# Altium PCB ESP32_HID.PcbDoc (part 1 of 2)
Units mm, origin at the board's own origin, x right, y up, seen from the top; angles counter-clockwise.
Board outline 200 x 178.5 mm, 4 copper layers (Top Layer, Layer 1, Layer 2, Bottom Layer), stack 1.781 mm thick; 132 components, 105 nets, 776 pads, 137 vias.
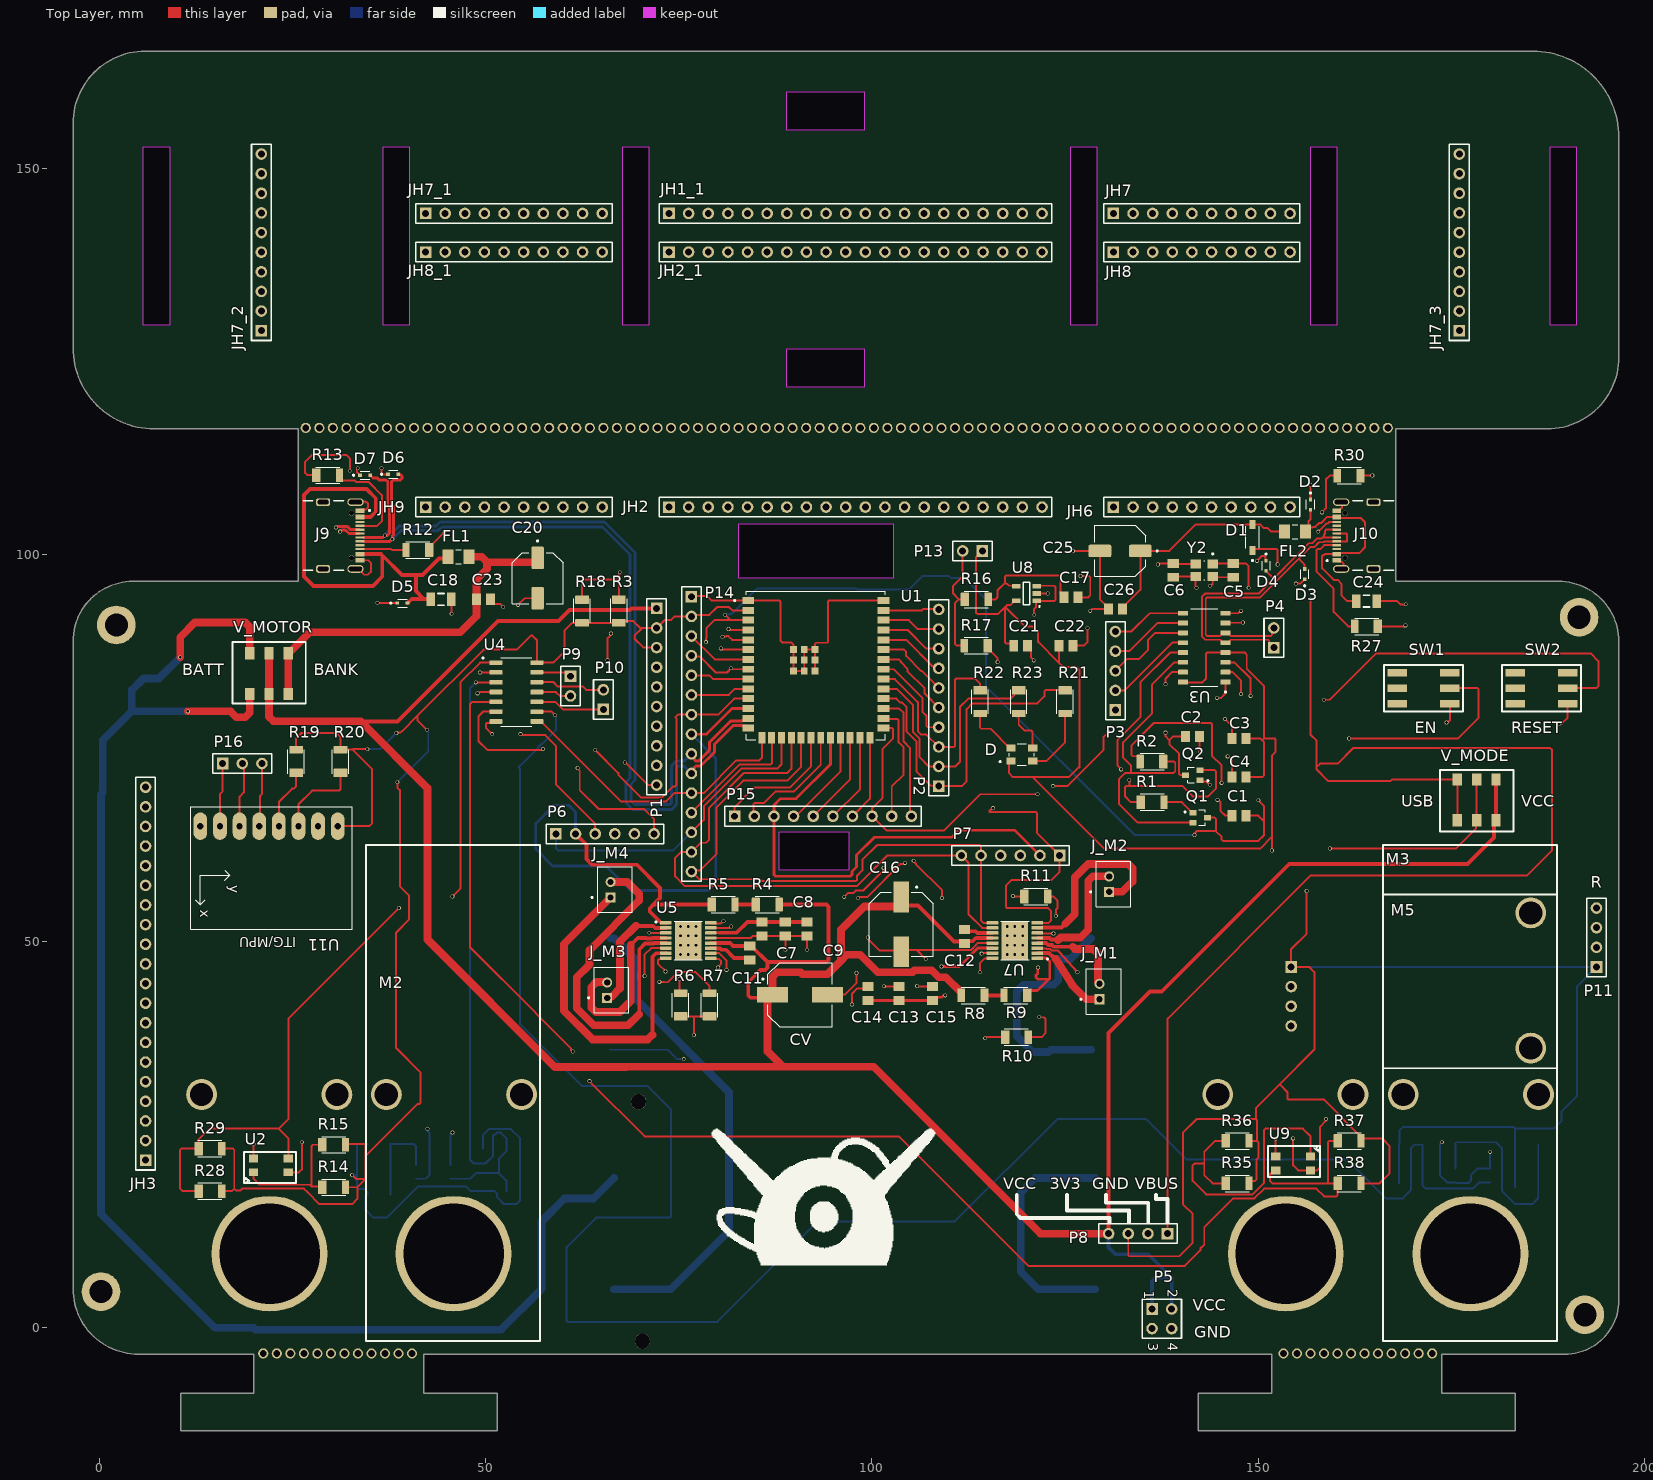
[diagram p0: Top Layer view]
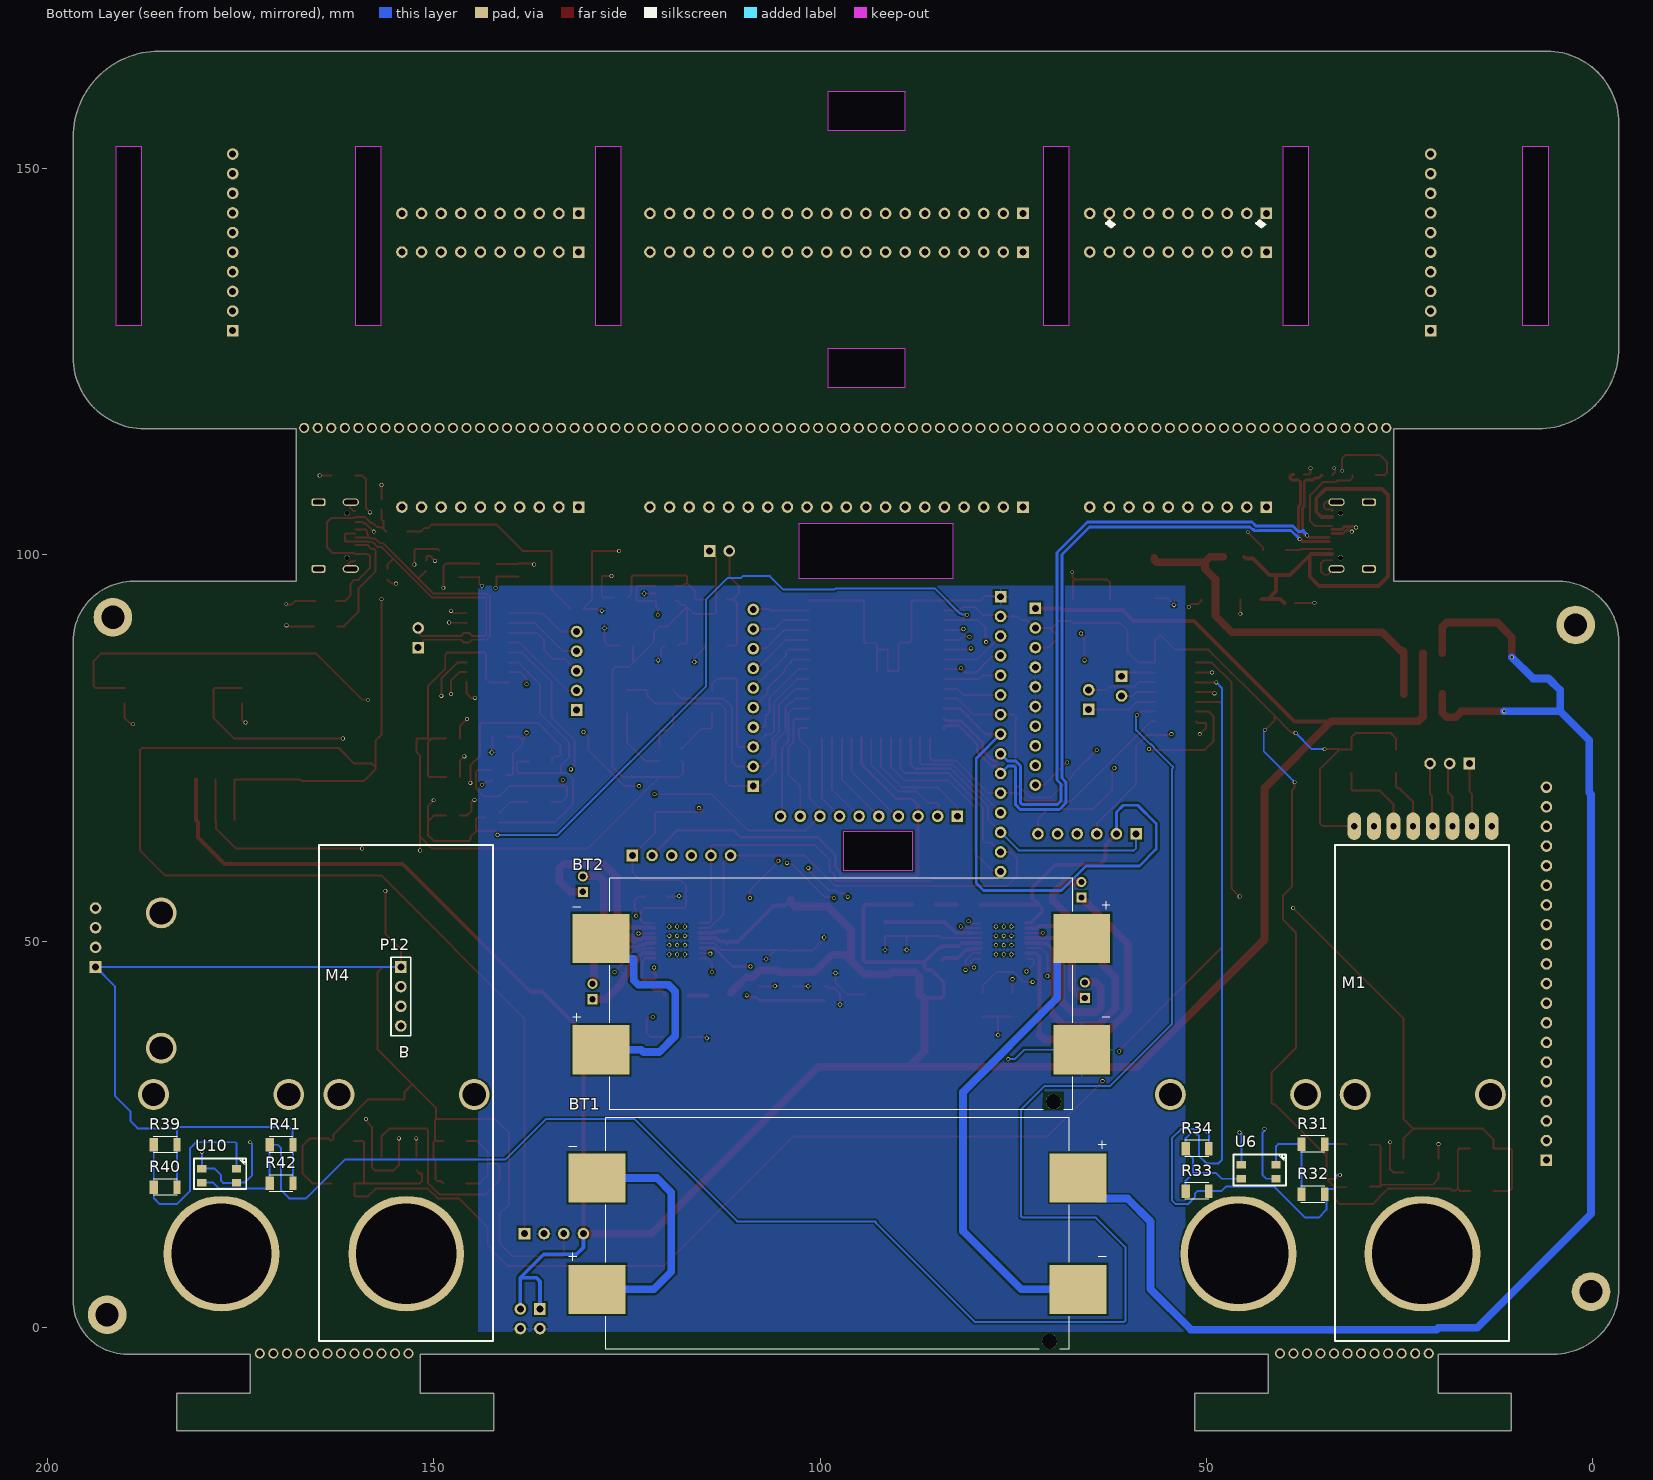
[diagram p1: Bottom Layer view, seen from below]
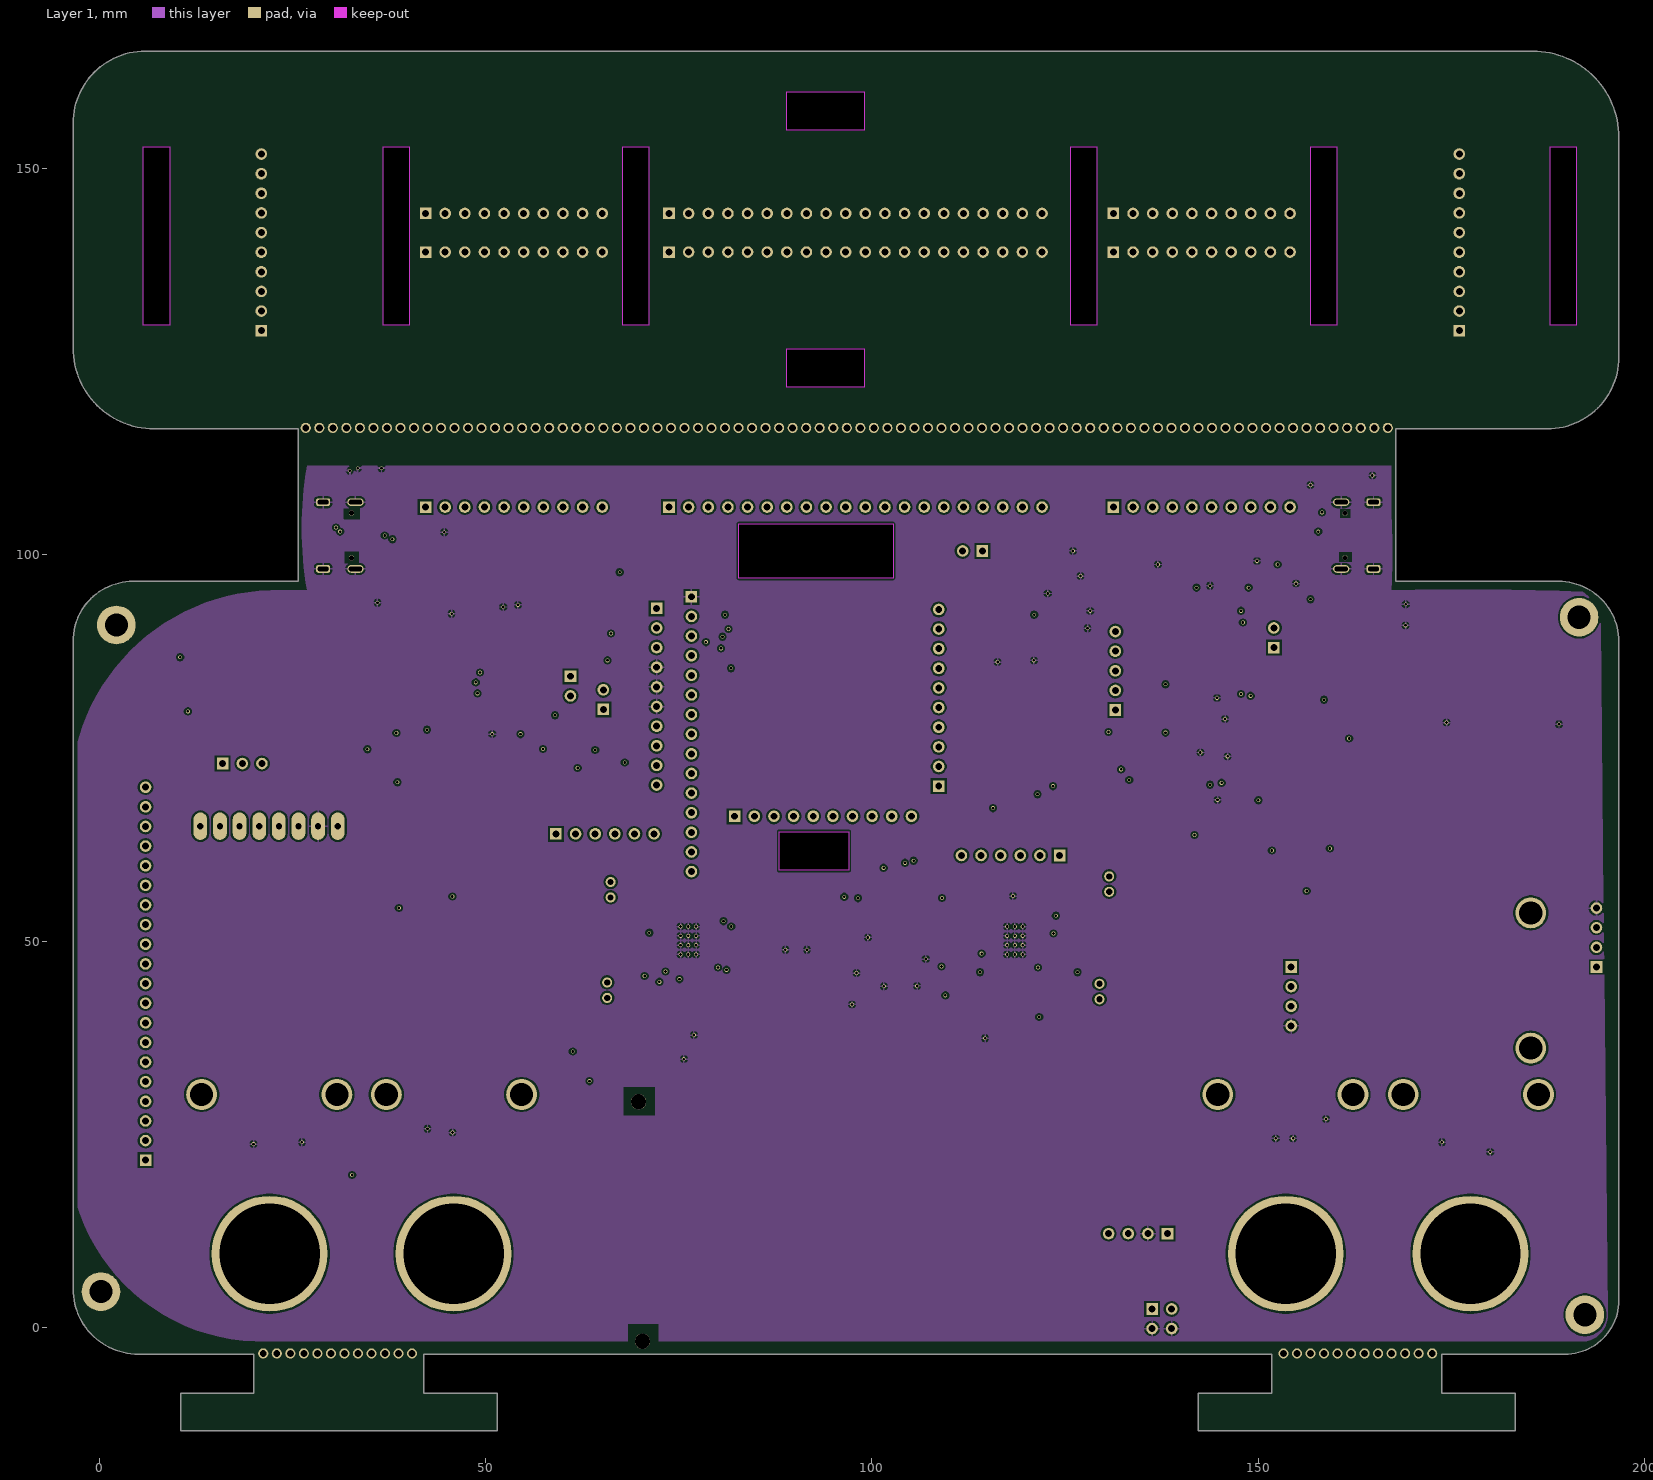
[diagram p2: Layer 1]
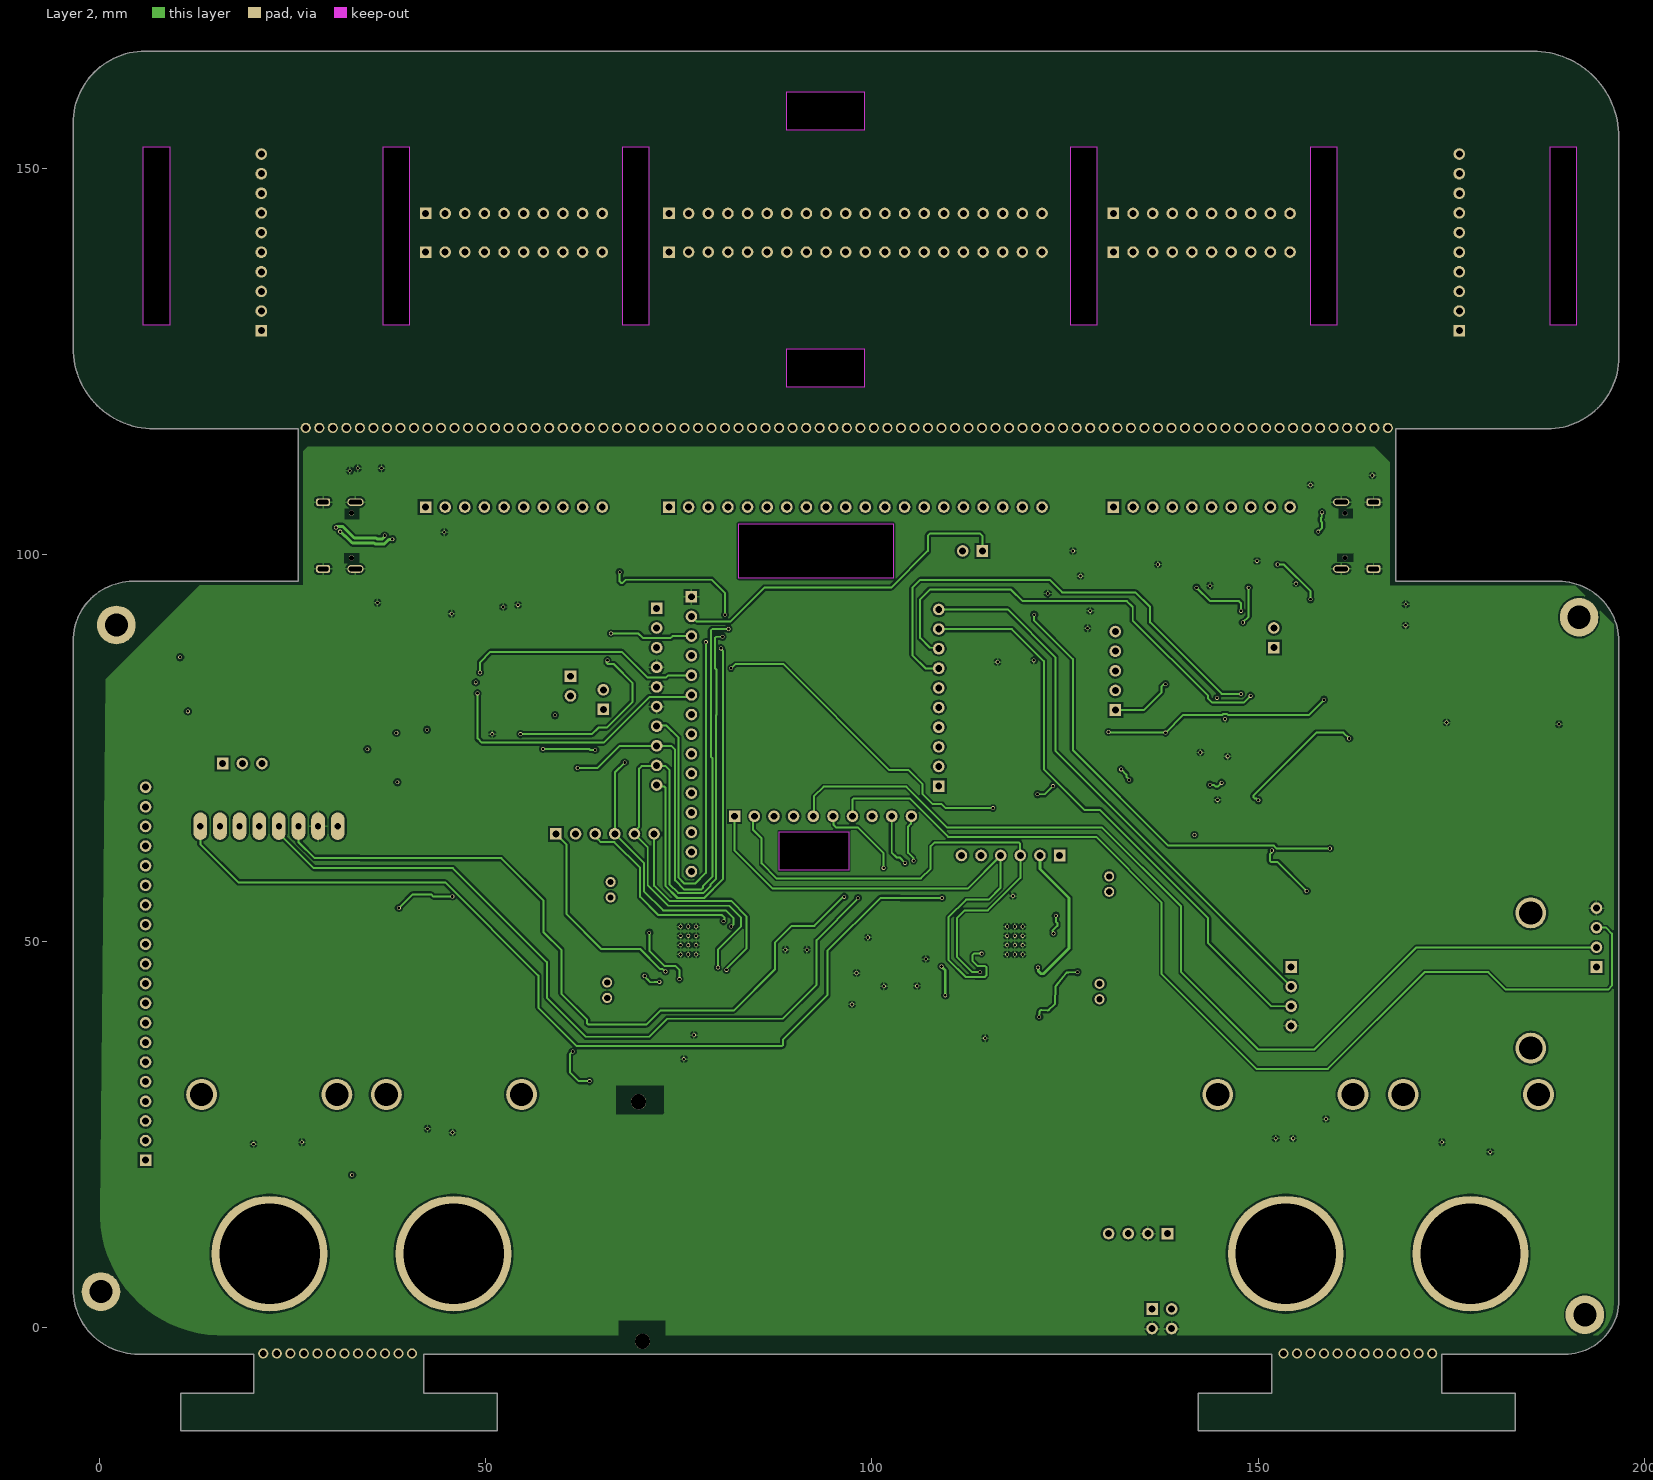
[diagram p3: Layer 2]

## Layer stack, top to bottom
Top Solder: solder mask 0.0254, SM-001, Dk 4
Top Layer: signal copper 0.035
Dielectric 2: prepreg 0.0711, PP-006, Dk 4.1
Layer 1: signal copper 0.035
Dielectric 1: core 1.4986, Core-043, Dk 4.3
Layer 2: signal copper 0.035
Dielectric 3: prepreg 0.0711, PP-006, Dk 4.1
Bottom Layer: signal copper 0.035
Bottom Solder: solder mask 0.0254, SM-001, Dk 4

## Board outline
151.75,-3.425 151.75,-8.475 142.25,-8.475 142.25,-13.325 183.25,-13.325 183.25,-8.475 173.75,-8.475 173.75,-3.425 189.65,-3.425 ccw(c189.663,3.562) 196.65,3.575 196.65,88.775 ccw(c188.85,88.775) 188.85,96.575 167.75,96.575 167.75,116.3 187.375,116.3 ccw(c187.375,125.575) 196.65,125.575 196.65,154.025 ccw(c185.5,154.025) 185.5,165.175 6,165.175 ccw(c6,155.825) -3.35,155.825 -3.35,126.775 ccw(c7.125,126.775) 7.125,116.3 25.75,116.3 25.75,96.575 4.4,96.575 ccw(c4.4,88.825) -3.35,88.825 -3.35,5.032 ccw(c5.094,5.019) 5.1,-3.425 20,-3.425 20,-8.475 10.55,-8.475 10.55,-13.325 51.5,-13.325 51.5,-8.475 42,-8.475 42,-3.425 53.648,-3.425 cw(c53.649,-3.425) 53.65,-3.425
cut-out: 99,159.925 99,154.925 89,154.925 89,159.925
cut-out: 99,126.675 99,121.675 89,121.675 89,126.675
cut-out: 156.75,129.675 156.75,152.825 160.125,152.825 160.125,129.675
cut-out: 187.75,129.675 187.75,152.825 191.125,152.825 191.125,129.675
cut-out: 125.75,129.675 125.75,152.825 129.125,152.825 129.125,129.675
cut-out: 67.75,129.675 67.75,152.825 71.125,152.825 71.125,129.675
cut-out: 36.75,129.675 36.75,152.825 40.125,152.825 40.125,129.675
cut-out: 5.75,129.675 5.75,152.825 9.125,152.825 9.125,129.675
cut-out: 97,64.175 97,59.175 88,59.175 88,64.175
cut-out: 102.75,104 102.75,97 82.75,97 82.75,104

## Design rules (kind name [scope] priority, off if disabled: settings)
Clearance [All] p1: gap=0.254 ignorepadtopadclearanceinfootprint=FALSE except(0.1: Poly-Hole; 0.127: Arc-Arc Arc-Track Arc-SMDPad Track-Track Track-SMDPad SMDPad-SMDPad SMDPad-THPad; 0.2: Arc-THPad Track-THPad)
DiffPairsRouting [All] p1: maxlimit=0.254 minlimit=0.127 mostfreqgap=0.254 toplayer_minwidth=0.254 toplayer_maxwidth=0.381 toplayer_prefwidth=0.381 midlayer1_minwidth=0.254 midlayer1_maxwidth=0.381 midlayer1_prefwidth=0.381 midlayer2_minwidth=0.254 midlayer2_maxwidth=0.381 midlayer2_prefwidth=0.381 bottomlayer_minwidth=0.254 bottomlayer_maxwidth=0.381 bottomlayer_prefwidth=0.381 maxuncoupledlength=12.7
HoleSize [All] p1: absolutevalues=TRUE maxlimit=13 minlimit=0.025 maxpercent=80.000 minpercent=20.000
MinimumSolderMaskSliver [All] p1: minsoldermaskwidth=0.05
PolygonConnect [All] p1: connectstyle=Relief reliefconductorwidth=0.254 reliefentries=4 polygonreliefangle="90 Angle" airgapwidth=0.254
RoutingVias [All] p1: holewidth=0.2 width=0.5 viastyle="Through Hole" minholewidth=0.15 minwidth=0.2 maxholewidth=0.2 maxwidth=0.5
SilkToSilkClearance [All] p1: silktosilkclearance=0.01
SilkToSolderMaskClearance [IsPad] p1: minsilkscreentomaskgap=0.001 clearancetoexposedcopper=TRUE
SolderMaskExpansion [All] p1: expansion=0.102 istentingtop=FALSE
SupplyNets "Schematic Supply Nets_4" [InNet('GND')] p1: voltage=0.000
SupplyNets "Schematic Supply Nets_3" [InNet('VCC')] p2: voltage=0.000
SupplyNets "Schematic Supply Nets_2" [InNet('3V3')] p3: voltage=0.000
SupplyNets "Schematic Supply Nets_1" [InNet('VBUS')] p4: voltage=0.000
SupplyNets "Schematic Supply Nets" [InNet('VBAT')] p5: voltage=0.000
UnRoutedNet [All] p1: checkbadconnections=TRUE
Width "Schematic Width Constraint_6" [InNet('NetC18_2')] p1: maxlimit=0.5 minlimit=0.254 preferedwidth=0.254
Width "Schematic Width Constraint_5" [InNet('VBANK')] p2: maxlimit=1 minlimit=0.3 preferedwidth=0.5
Width "Schematic Width Constraint_4" [InNet('NetBT2_N2')] p3: maxlimit=1 minlimit=0.254 preferedwidth=0.5 midlayer1_maxwidth=0.254 midlayer1_prefwidth=0.254 midlayer2_maxwidth=0.254 midlayer2_prefwidth=0.254 minimp=50.000000 maximp=50.000000 favimp=50.000000
Width "Schematic Width Constraint_3" [InNet('VBAT')] p4: maxlimit=1 minlimit=0.254 preferedwidth=0.5 midlayer1_maxwidth=0.254 midlayer1_prefwidth=0.254 midlayer2_maxwidth=0.254 midlayer2_prefwidth=0.254 minimp=50.000000 maximp=50.000000 favimp=50.000000
Width "Schematic Width Constraint_2" [InNet('NetBT1_N1')] p5: maxlimit=1 minlimit=0.254 preferedwidth=0.5 midlayer1_maxwidth=0.254 midlayer1_prefwidth=0.254 midlayer2_maxwidth=0.254 midlayer2_prefwidth=0.254 minimp=50.000000 maximp=50.000000 favimp=50.000000
Width "Schematic Width Constraint_1" [InNet('NetBT1_N2')] p6: maxlimit=1 minlimit=0.254 preferedwidth=0.5 midlayer1_maxwidth=0.254 midlayer1_prefwidth=0.254 midlayer2_maxwidth=0.254 midlayer2_prefwidth=0.254 minimp=50.000000 maximp=50.000000 favimp=50.000000
Width "Schematic Width Constraint" [InNetClass('Vm')] p7: maxlimit=1 minlimit=0.354 preferedwidth=0.5
Width Width_1 [All] p8: maxlimit=0.254 minlimit=0.13 preferedwidth=0.254
24 further rules are at their usual default settings.

## Classes and differential pairs
component class U_Sensors: P9 P10 P11 P12 P16 R14 R15 R19 R20 R28 R29 R31 R32 R33 R34 R35 R36 R37 R38 R39 R40 R41 R42 U2 U4 U6 U9 U10 U11
net class Vm: NetC7_1 NetC11_2 NetC12_2 NetC13_1 NetJ_M1_1 NetJ_M1_2 NetJ_M2_1 NetJ_M2_2 NetJ_M3_1 NetJ_M3_2 NetJ_M4_1 NetJ_M4_2 NetR4_1 NetR8_1 NSLEEP NSLEEP_2 VCC
component class "U_DC Motor Control": C7 C8 C9 C11 CV J_M3 J_M4 M3 M4 P6 R4 R5 R6 R7 U5
component class "U_DC Motor Control_2": C12 C13 C14 C15 C16 J_M1 J_M2 M1 M2 P7 R8 R9 R10 R11 U7
component class "U_Power Regulation": BT1 BT2 C17 C18 C20 C21 C22 C23 D5 D6 D7 FL1 J9 P5 P8 P13 R12 R13 R16 R17 U8 V_MODE V_MOTOR
component class U_USB: C1 C2 C3 C4 C5 C6 C24 C25 C26 D1 D2 D3 D4 FL2 J10 P3 P4 Q1 Q2 R1 R2 R27 R30 SW1 SW2 U3 Y2
component class U_ESP32_S2_solo: D P1 P2 P14 P15 R3 R18 R21 R22 R23 U1
differential pair D1: +D1_P -D1_N
differential pair D: +D_P -D_N

## Components (designator, comment, footprint, x,y, rotation, side; value= is the part's Value field where it differs from the comment)
BT1 "1012" BAT_1012 97.75,12.175 r0 bottom
BT2 "1012" BAT_1012 97.25,43.175 r0 bottom
C1 "0.1uf" CAPC2012X140N 147.5,66.25 r0 top
C2 "0.1uf" CAPC2012X140N 141.5,76.5 r180 top
C3 "0.1uf" CAPC2012X140N 147.5,76.25 r0 top
C4 "0.1uf" CAPC2012X140N 147.5,71.25 r0 top
C5 "33pf" CAPC2012X140N 146.75,98 r270 top
C6 "33pf" CAPC2012X140N 139,98 r90 top
C7 "LD051A121KAB2A" CAPC2012X140N 88.8,51.6 r270 top
C8 "LD051A121KAB2A" CAPC2012X140N 85.8,51.6 r270 top
C9 "LD051A121KAB2A" CAPC2012X140N 91.6,51.6 r270 top
C11 "LD051A121KAB2A" CAPC2012X140N 84.2,48.5 r270 top
C12 "LD051A121KAB2A" CAPC2012X140N 112,50.6 r90 top
C13 "LD051A121KAB2A" CAPC2012X140N 103.5,43.25 r90 top
C14 "LD051A121KAB2A" CAPC2012X140N 99.5,43.25 r90 top
C15 "LD051A121KAB2A" CAPC2012X140N 107.85,43.25 r90 top
C16 "EEEHA1V101UP" CAP_EEEHA1V101UP 103.8,52.2 r270 top
C17 "0.1uf" CAPC2012X140N 125.75,94.5 r180 top
C18 "Cap Semi" C1206 44.25,94.25 r180 top value=10nF
C20 "10uf" CAPAE660X550N 56.75,97 r270 top
C21 "0.1uf" CAPC2012X140N 119.25,88.25 r180 top
C22 "0.1uf" CAPC2012X140N 125.1,88.25 r180 top
C23 "0.1uf" CAPC2012X140N 49.75,94.25 r180 top
C24 "Cap Semi" C1206 164,94 r180 top value=10nF
C25 "10uf" CAPAE660X550N 132.115,100.5 r180 top
C26 "0.1uf" CAPC2012X140N 131.5,93 r0 top
CV "EEEHA1V101UP" CAP_EEEHA1V101UP 90.7,43.1 r0 top (schematic designator C10)
D "LL-R3528RGBC-008-B" LED_LL-R3528RGBC-008-B 119.4,74.15 r0 top
D1 "1N5819HW-7-F" SOD3715X145N 149.25,102.25 r90 top
D2 "LESD5D5.0CT1G" TVS_LESD5D5.0CT1G 156.75,106.5 r270 top
D3 "LESD5D5.0CT1G" TVS_LESD5D5.0CT1G 156,97.5 r90 top
D4 "LESD5D5.0CT1G" TVS_LESD5D5.0CT1G 151,98.59 r270 top
D5 "LESD5D5.0CT1G" TVS_LESD5D5.0CT1G 39.25,93.75 r0 top
D6 "LESD5D5.0CT1G" TVS_LESD5D5.0CT1G 38.06,110.425 r0 top
D7 "LESD5D5.0CT1G" TVS_LESD5D5.0CT1G 34.425,110.3 r0 top
FL1 "BLM31PG330SN1L" BEADC3216X130N 46.5,99.75 r0 top
FL2 "BLM31PG330SN1L" BEADC3216X130N 154.75,103 r180 top
J9 "USB4105-GF-A" GCT_USB4105-GF-A 29,102.5 r270 top
J10 "USB4105-GF-A" GCT_USB4105-GF-A 164.9,102.5 r90 top
J_M1 "B2B-PH-K-S(LF)(SN)" JST_B2B-PH-K-S(LF)(SN) 130,43.5 r270 top
J_M2 "B2B-PH-K-S(LF)(SN)" JST_B2B-PH-K-S(LF)(SN) 131.25,57.4 r270 top
J_M3 "B2B-PH-K-S(LF)(SN)" JST_B2B-PH-K-S(LF)(SN) 66.3,43.675 r270 top
J_M4 "B2B-PH-K-S(LF)(SN)" JST_B2B-PH-K-S(LF)(SN) 66.75,56.675 r270 top
JH1_1 "Comment" HDR1X20 73.75,144.175 r0 top
JH2 "Comment" HDR1X20 73.75,106.175 r0 top
JH2_1 "Comment" HDR1X20 73.75,139.175 r0 top
JH3 "Comment" HDR1X20 6.025,21.675 r90 top
JH6 "Comment" HDR1X10 131.25,106.175 r0 top
JH7 "Comment" HDR1X10 131.25,144.175 r0 top
JH7_1 "Comment" HDR1X10 42.25,144.175 r0 top
JH7_2 "Comment" HDR1X10 21,129 r90 top
JH7_3 "Comment" HDR1X10 176,129 r90 top
JH8 "Comment" HDR1X10 131.25,139.175 r0 top
JH8_1 "Comment" HDR1X10 42.25,139.175 r0 top
JH9 "Comment" HDR1X10 42.25,106.175 r0 top
M1 "Motor_Mechanical" MOTOR_MECHANICAL 13.275,30.175 r0 bottom
M2 "Motor_Mechanical" MOTOR_MECHANICAL 54.675,30.175 r180 top
M3 "Motor_Mechanical" MOTOR_MECHANICAL 186.25,30.175 r180 top
M4 "Motor_Mechanical" MOTOR_MECHANICAL 144.75,30.175 r0 bottom
P1 "Header 10" HDR1X10 72.15,93.075 r270 top
P2 "Header 10" HDR1X10 108.65,70.075 r90 top
P3 "Header 5" HDR1X5 131.5,79.92 r90 top
P4 "Header 2" HDR1X2 152,88 r90 top
P5 "Header 2X2" HDR2X2 136.25,2.425 r270 top
P6 "Header 6" HDR1X6 59.12,63.9 r0 top
P7 "Header 6" HDR1X6 124.28,61.1 r180 top
P8 "Header 4" HDR1X4 138.25,12.175 r180 top
P9 "Header 2" HDR1X2 61,84.29 r270 top
P10 "Header 2" HDR1X2 65.25,80 r90 top
P11 "Header 4" HDR1X4 193.75,46.675 r90 top
P12 "Header 4" HDR1X4 154.25,46.675 r270 bottom
P13 "Header 2" HDR1X2 114.29,100.5 r180 top
P14 "Header 15" HDR1X15 76.65,94.575 r270 top
P15 "Header 10" HDR1X10 82.25,66.175 r0 top
P16 "Header 3" HDR1X3 16,73 r0 top
Q1 "BC846BW_RF" TRANS_BC846BW_RF 142.5,66 r0 top
Q2 "BC846BW_RF" TRANS_BC846BW_RF 141.5,71.5 r180 top
R1 "10k" RESC3115X65N 136.25,68 r0 top
R2 "10k" RESC3115X65N 136.25,73.25 r180 top
R3 "10k" RESC3115X65N 67.25,92.75 r270 top
R4 "1-1879462-4" RESC3115X65N 86.465,54.75 r0 top
R5 "1-1879462-4" RESC3115X65N 80.75,54.75 r0 top
R6 "1-1879462-4" RESC3115X65N 75.25,41.75 r90 top
R7 "1-1879462-4" RESC3115X65N 79,41.75 r90 top
R8 "1-1879462-4" RESC3115X65N 113.1,43 r180 top
R9 "1-1879462-4" RESC3115X65N 118.635,43 r180 top
R10 "1-1879462-4" RESC3115X65N 118.7,37.6 r0 top
R11 "1-1879462-4" RESC3115X65N 121.2,55.8 r0 top
R12 "5.1k" RESC3115X65N 41.25,100.625 r180 top
R13 "5.1k" RESC3115X65N 29.59,110.3 r0 top
R14 "10k" RESC3115X65N 30.35,18.175 r0 top
R15 "10k" RESC3115X65N 30.35,23.675 r0 top
R16 "0 ohm" RESC3115X65N 113.5,94.25 r0 top
R17 "1k" RESC3115X65N 113.5,88.25 r180 top
R18 "10k" RESC3115X65N 62.5,92.75 r270 top
R19 "10k" RESC3115X65N 25.5,73.25 r90 top
R20 "10k" RESC3115X65N 31.25,73.25 r90 top
R21 "1k" RESC3115X65N 125,81 r270 top
R22 "1k" RESC3115X65N 114,81 r270 top
R23 "1k" RESC3115X65N 119,81 r270 top
R27 "5.1k" RESC3115X65N 164,90.75 r180 top
R28 "10k" RESC3115X65N 14.35,17.675 r0 top
R29 "10k" RESC3115X65N 14.35,23.175 r0 top
R30 "5.1k" RESC3115X65N 161.75,110.25 r180 top
R31 "10k" RESC3115X65N 36.25,23.75 r180 bottom
R32 "10k" RESC3115X65N 36.25,17.25 r180 bottom
R33 "10k" RESC3115X65N 51.25,17.675 r180 bottom
R34 "10k" RESC3115X65N 51.25,23.175 r180 bottom
R35 "10k" RESC3115X65N 147.25,18.675 r0 top
R36 "10k" RESC3115X65N 147.25,24.175 r0 top
R37 "10k" RESC3115X65N 161.75,24.175 r0 top
R38 "10k" RESC3115X65N 161.75,18.675 r0 top
R39 "10k" RESC3115X65N 184.75,23.675 r180 bottom
R40 "10k" RESC3115X65N 184.75,18.175 r180 bottom
R41 "10k" RESC3115X65N 169.75,23.675 r180 bottom
R42 "10k" RESC3115X65N 169.75,18.675 r180 bottom
SW1 "Push button" XKB5858-Z-TP-75 171.25,82.75 r0 top
SW2 "Push button" XKB5858-Z-TP-75 186.5,82.75 r0 top
U1 "ESP32-S2-SOLO-U-N4R2" XCVR_ESP32-S2-SOLO-U-N4R2 92.75,85.675 r0 top
U2 "JNJ-ITR8307" JNJ-ITR8307 22.25,20.5 r0 top
U3 "CH340G" SOIC127P600X180-16N 143,88 r180 top
U4 "SN74LS14DR" SOP127P602X175-14N 54,82.25 r0 top
U5 "DRV8833PWPR" IC_DRV8833PWPR 76.25,50.1 r0 top
U6 "JNJ-ITR8307" JNJ-ITR8307 43.25,20.675 r0 bottom
U7 "DRV8833PWPR" IC_DRV8833PWPR 118.5,50.1 r180 top
U8 "MIC5205-2.5YM5-TR" SOT95P280X145-5N 120,95 r180 top
U9 "JNJ-ITR8307" JNJ-ITR8307 154.5,21.75 r180 top
U10 "JNJ-ITR8307" JNJ-ITR8307 177.75,20.175 r0 bottom
U11 "GY-521" GY-521 22,56 r270 top
V_MODE "MS-22C01-G010" "G SWITCH" 178.25,68.175 r180 top
V_MOTOR "MS-22C01-G010" "G SWITCH" 22,84.75 r0 top
Y2 "12MHZ" XTAL_ABM8W-32.0000MHZ-6-B1U-T3 143,98 r270 top

## Footprints (in the part's own frame and the unit in brackets; to place one, negate y for a bottom-side part, rotate by r counter-clockwise, add the part's x,y. Pads: shape width x height; smd on the part's side, far side on the other; paste and mask are expansions set on the pad)
BAT_1012 [mm]
  rect 7.34x6.35 smd: N1(-31.105,7.21) N2(31.105,-7.21) P1(31.105,7.21) P2(-31.105,-7.21)
  round 1.98 hole 1.98 unplated: ""(-27.435,13.94)
  silkscreen extent -34.75,-14.98 34.75,14.98, body extent -34.56,-14.9 34.56,15.07, height 14.86
BEADC3216X130N [mm]
  rect 1.4x1.82 smd: 1(-1.36,0) 2(1.36,0)
  silkscreen extent -0.34,-0.9 0.34,0.9, body extent -1.6,-0.8 1.6,0.8, height 1.3
C1206 [mm] "Chip Capacitor, Body 3.2x1.6mm, IPC High Density"
  rect 1.1x1.7 smd: 1(-1.35,0) 2(1.35,0)
  silkscreen extent -0.4,-0.75 0.4,0.75, body extent -1.7,-0.9 1.7,0.9, height 1.3
CAP_EEEHA1V101UP [mm]
  rect 4x2 smd: 1(-3.55,0) 2(3.55,0)
  silkscreen extent -4.9,-4.15 4.15,4.15, body extent -4.85,-4.15 4.85,4.15, height 10.2
CAPAE660X550N [mm]
  rrect25% 2.94x1.62 smd: N(2.615,0) P(-2.615,0)
  silkscreen extent -4.9,-3.3 3.3,3.3, body extent -3.5,-3.3 3.5,3.3, height 5.5
CAPC2012X140N [mm]
  rect 1.15x1.45 smd: 1(-0.9,0) 2(0.9,0)
  body extent -1,-0.63 1,0.63, height 0.94
"G SWITCH" [mm] "Standing paste 1A DPDT 6V Black 10000 times SMD Slide Switches ROHS"
  rect 1.2x1.6 smd: 1(-2.5,2.5) 2(0,2.5) 3(2.5,2.5) 4(-2.5,-2.75) 5(0,-2.75) 6(2.5,-2.75)
  silkscreen extent -4.75,-4 4.75,4, body extent -4.5,-3.75 4.5,3.75, height 5.51
GCT_USB4105-GF-A [mm]
  rect 0.6x1.15 smd: A1_B12(-3.2,4.755) A4_B9(-2.4,4.755) B1_A12(3.2,4.755) B4_A9(2.4,4.755)
  rect 0.3x1.15 smd: A5(-1.25,4.755) A6(-0.25,4.755) A7(0.25,4.755) A8(1.25,4.755) B5(1.75,4.755) B6(0.75,4.755) B7(-0.75,4.755) B8(-1.75,4.755)
  oval 1x2.1 hole 0.6 slot 1.7 at 90 deg: SH1(-4.32,4.18) SH2(4.32,4.18)
  rrect50% 1x1.8 hole 0.6 slot 1.4 at 90 deg: SH3(-4.32,0) SH4(4.32,0)
  round 0.65 hole 0.65 unplated: ""(-2.89,3.68) ""(2.89,3.68)
  silkscreen extent -4.47,-2.6 4.47,6.1, body extent -4.47,-2.6 4.47,5.11, height 3.31
GY-521 [mil]
  oval 140x70 hole 31.5: ADO(-350,-250) GND(-350,250) INT(-350,-350) SCL(-350,150) SDA(-350,50) VCC(-350,350) XCL(-350,-150) XDA(-350,-50)
  silkscreen extent -450,-400 175,425
HDR1X2 [mm] "Connector; Header; 2 Position"
  rect 1.5x1.5 hole 0.9: 1(0,0)
  round 1.5 hole 0.9: 2(2.54,0)
  silkscreen extent -1.27,-1.27 3.81,1.27
HDR1X3 [mm] "Connector; Header; 3 Position"
  rect 1.5x1.5 hole 0.9: 1(0,0)
  round 1.5 hole 0.9: 2(2.54,0) 3(5.08,0)
  silkscreen extent -1.27,-1.27 6.35,1.27
HDR1X4 [mm] "Connector; Header; 4 Position"
  rect 1.5x1.5 hole 0.9: 1(0,0)
  round 1.5 hole 0.9: 2(2.54,0) 3(5.08,0) 4(7.62,0)
  silkscreen extent -1.27,-1.27 8.89,1.27
HDR1X5 [mm] "Connector; Header; 5 Position"
  rect 1.5x1.5 hole 0.9: 1(0,0)
  round 1.5 hole 0.9: 2(2.54,0) 3(5.08,0) 4(7.62,0) 5(10.16,0)
  silkscreen extent -1.27,-1.27 11.43,1.27
HDR1X6 [mm] "Connector; Header; 6 Position"
  rect 1.5x1.5 hole 0.9: 1(0,0)
  round 1.5 hole 0.9: 2(2.54,0) 3(5.08,0) 4(7.62,0) 5(10.16,0) 6(12.7,0)
  silkscreen extent -1.27,-1.27 13.97,1.27
HDR1X10 [mm] "Connector; Header; 10 Position"
  rect 1.5x1.5 hole 0.9: 1(0,0)
  round 1.5 hole 0.9: 2(2.54,0) 3(5.08,0) 4(7.62,0) 5(10.16,0) 6(12.7,0) 7(15.24,0) 8(17.78,0) 9(20.32,0) 10(22.86,0)
  silkscreen extent -1.27,-1.27 24.13,1.27
HDR1X15 [mm] "Connector; Header; 15 Position"
  rect 1.5x1.5 hole 0.9: 1(0,0)
  round 1.5 hole 0.9: 2(2.54,0) 3(5.08,0) 4(7.62,0) 5(10.16,0) 6(12.7,0) 7(15.24,0) 8(17.78,0) 9(20.32,0) 10(22.86,0) 11(25.4,0) 12(27.94,0) 13(30.48,0) 14(33.02,0) 15(35.56,0)
  silkscreen extent -1.27,-1.27 36.83,1.27
HDR1X20 [mm] "Connector; Header; 20 Position"
  rect 1.5x1.5 hole 0.9: 1(0,0)
  round 1.5 hole 0.9: 2(2.54,0) 3(5.08,0) 4(7.62,0) 5(10.16,0) 6(12.7,0) 7(15.24,0) 8(17.78,0) 9(20.32,0) 10(22.86,0) 11(25.4,0) 12(27.94,0) 13(30.48,0) 14(33.02,0) 15(35.56,0) 16(38.1,0) 17(40.64,0) 18(43.18,0) 19(45.72,0) 20(48.26,0)
  silkscreen extent -1.27,-1.27 49.53,1.27
HDR2X2 [mm] "Connector; Header; 2x2 Position"
  rect 1.5x1.5 hole 0.9: 1(0,0)
  round 1.5 hole 0.9: 2(0,2.54) 3(2.54,0) 4(2.54,2.54)
  silkscreen extent -1.27,-1.27 3.81,3.81
IC_DRV8833PWPR [mm]
  rrect25% 1.5x0.45 smd: 1(-2.9,2.275) 2(-2.9,1.625) 3(-2.9,0.975) 4(-2.9,0.325) 5(-2.9,-0.325) 6(-2.9,-0.975) 7(-2.9,-1.625) 8(-2.9,-2.275) 9(2.9,-2.275) 10(2.9,-1.625) 11(2.9,-0.975) 12(2.9,-0.325) 13(2.9,0.325) 14(2.9,0.975) 15(2.9,1.625) 16(2.9,2.275)
  rect 3.4x5 smd paste-3 mask+0: 17(0,0)
  round 0.5 hole 0.35 mask+0: 18(-1,1.8) 19(0,1.8) 20(1,1.8) 21(-1,0.6) 22(0,0.6) 23(1,0.6) 24(-1,-0.6) 25(0,-0.6) 26(1,-0.6) 27(-1,-1.8) 28(0,-1.8) 29(1,-1.8)
  silkscreen extent -4.3,-2.5 1.83,2.5, body extent -3.2,-2.5 3.2,2.5, height 1.2
JNJ-ITR8307 [mm] "SMD-4P,3.4x2.7mm Reflective Optical Interrupters ROHS"
  rect 1.2x1 smd: 1(-2.25,-0.4) 2(2.25,-0.4) 3(-2.25,1.4) 4(2.25,1.4)
  silkscreen extent -3.5,-1.75 3.25,2.25
JST_B2B-PH-K-S(LF)(SN) [mm]
  rect 1.308x1.308 / inner round 1.308 / far side rect 1.308x1.308 hole 0.8: 1(1,-0.55)
  round 1.308 hole 0.8: 2(-1,-0.55)
  silkscreen extent -2.95,-3.05 2.95,2.25, body extent -2.95,-2.25 2.95,2.25, height 6
LED_LL-R3528RGBC-008-B [mm]
  rect 1.2x0.9 smd: 1(-1.4,-0.85) 2(1.4,-0.85) 3(1.4,0.85) 4(-1.4,0.85)
  silkscreen extent -2.9,-1.4 1.6,1.4
MOTOR_MECHANICAL [mm]
  round 4 hole 3: 1(0,0) 1(17.5,0)
  round 15 hole 13: 1(8.8,20.6)
  silkscreen extent -2.4,-32.3 20.1,31.9
RESC3115X65N [mm]
  rrect14% 1.09x1.77 smd: 1(-1.465,0)
  rrect14% 0.94x1.77 smd: 2(1.54,0)
  silkscreen extent -1.55,-1.06 1.55,1.06
SOD3715X145N [mm]
  rect 1.21x0.73 smd: A(1.68,0) C(-1.68,0)
  silkscreen extent -3.1,-0.85 1.43,0.85, body extent -1.83,-0.77 1.83,0.77, height 0.8
SOIC127P600X180-16N [mm]
  rrect25% 1.31x0.62 smd: 1(-2.75,4.445) 2(-2.75,3.175) 3(-2.75,1.905) 4(-2.75,0.635) 5(-2.75,-0.635) 6(-2.75,-1.905) 7(-2.75,-3.175) 8(-2.75,-4.445) 9(2.75,-4.445) 10(2.75,-3.175) 11(2.75,-1.905) 12(2.75,-0.635) 13(2.75,0.635) 14(2.75,1.905) 15(2.75,3.175) 16(2.75,4.445)
  silkscreen extent -2.85,-5 1.77,5.85, body extent -3,-5 3,5, height 1.8
SOP127P602X175-14N [mm]
  rrect25% 1.67x0.59 smd: 1(-2.645,3.81) 2(-2.645,2.54) 3(-2.645,1.27) 4(-2.645,0) 5(-2.645,-1.27) 6(-2.645,-2.54) 7(-2.645,-3.81) 8(2.645,-3.81) 9(2.645,-2.54) 10(2.645,-1.27) 11(2.645,0) 12(2.645,1.27) 13(2.645,2.54) 14(2.645,3.81)
  silkscreen extent -4.41,-4.43 2,4.5
SOT95P280X145-5N [mm]
  rect 1.1x0.6 smd: 1(-1.3,0.95) 2(-1.3,0) 3(-1.3,-0.95) 4(1.3,-0.95) 5(1.3,0.95)
  silkscreen extent -1.78,-1.45 0.42,1.77, body extent -1.45,-1.35 1.45,1.35, height 1.45
TRANS_BC846BW_RF [mm]
  rect 0.9x0.7 smd: 1(-0.95,0.65) 2(-0.95,-0.65) 3(0.95,0)
  silkscreen extent -2.07,-1 0.63,1, body extent -1.05,-1 1.05,1, height 1.1
TVS_LESD5D5.0CT1G [mm]
  rect 0.48x0.4 smd: 1(-0.66,0) 2(0.66,0)
  silkscreen extent -1.6,-0.52 0.6,0.52, body extent -0.8,-0.4 0.8,0.4, height 0.7
XCVR_ESP32-S2-SOLO-U-N4R2 [mm]
  rect 1.5x0.9 smd: 1(-8.75,8.41) 2(-8.75,7.14) 3(-8.75,5.87) 4(-8.75,4.6) 5(-8.75,3.33) 6(-8.75,2.06) 7(-8.75,0.79) 8(-8.75,-0.48) 9(-8.75,-1.75) 10(-8.75,-3.02) 11(-8.75,-4.29) 12(-8.75,-5.56) 13(-8.75,-6.83) 14(-8.75,-8.1) 27(8.75,-8.1) 28(8.75,-6.83) 29(8.75,-5.56) 30(8.75,-4.29) 31(8.75,-3.02) 32(8.75,-1.75) 33(8.75,-0.48) 34(8.75,0.79) 35(8.75,2.06) 36(8.75,3.33) 37(8.75,4.6) 38(8.75,5.87) 39(8.75,7.14) 40(8.75,8.41)
  rect 0.9x1.5 smd: 15(-6.985,-9.35) 16(-5.715,-9.35) 17(-4.445,-9.35) 18(-3.175,-9.35) 19(-1.905,-9.35) 20(-0.635,-9.35) 21(0.635,-9.35) 22(1.905,-9.35) 23(3.175,-9.35) 24(4.445,-9.35) 25(5.715,-9.35) 26(6.985,-9.35)
  rect 0.9x0.9 smd: 41_1(-2.9,2.09) 41_2(-1.5,2.09) 41_3(-0.1,2.09) 41_4(-2.9,0.69) 41_5(-1.5,0.69) 41_6(-0.1,0.69) 41_7(-2.9,-0.71) 41_8(-1.5,-0.71) 41_9(-0.1,-0.71)
  silkscreen extent -10.6,-9.6 9,9.6
XKB5858-Z-TP-75 [mm] "250V 30V LATCHING Standing paste 100000 Times Without 160gf 100mA SMD Pushbutton Switches ROHS"
  rect 2.55x1 smd: 1(3.525,2) 2(3.525,0) 3(3.525,-2) 4(-3.275,2) 5(-3.275,0) 6(-3.275,-2)
  silkscreen extent -5,-3 5.25,3
XTAL_ABM8W-32.0000MHZ-6-B1U-T3 [mm]
  rect 1.15x1.4 smd: 1(-0.8,1.1) 2(-0.8,-1.1) 3(0.8,-1.1) 4(0.8,1.1)
  silkscreen extent -2.22,-0.08 1.25,1.2, body extent -1.25,-1.6 1.25,1.6, height 0.75

## Part data
BT1 BT2 C16 CV D2 D3 D4 D5 D6 D7 J9 J10 Q1 Q2 U1 U3: Package=None, Availability=Unavailable, Price=None
  BT1 BT2: MP=1012
  C16 CV: MF="{'manufacturer': u'Panasonic'}", MP=EEEHA1V101UP
  D2 D3 D4 D5 D6 D7: MF="{'manufacturer': u'Leshan Radio Co.'}", MP=LESD5D5.0CT1G
  J9 J10: MF="{'manufacturer': u'GCT'}", MP=USB4105-GF-A
  Q1 Q2: MF="{'manufacturer': u'Taiwan Semiconductor'}", MP=BC846BW_RF
  U1: MF="{'manufacturer': u'Espressif Systems'}", MP=ESP32-S2-SOLO-U-N4R2
  U3: MF="{'manufacturer': u'WCH'}", MP=CH340G
C1 C2 C3 C4 C5 C6 C17 C21 C22 C23 C26: library part LD051A121KAB2A, "120PF 100V 10% 0805", Package=None, Availability=Unavailable, MF="{'manufacturer': u'AVX'}", MP=LD051A121KAB2A, Price=None
C7 C8 C9 C11 C12 C13 C14 C15: "120PF 100V 10% 0805", Package=None, Availability=Unavailable, MF="{'manufacturer': u'AVX'}", MP=LD051A121KAB2A, Price=None
C18 C24: "Capacitor (Semiconductor SIM Model)", LatestRevisionDate=29-May-2009, LatestRevisionNote="IPC-7351 Footprint Added.", PackageDescription="Chip Capacitor", PackageReference=C1206, Published=8-Jun-2000, Publisher="Altium Limited"
C20 C25: library part UWX1H100MCL1GB
D: "LED; SMD; 3528, PLCC2; RGB; 3.5x2.8mm; 120Â°; Red lumin: 1", Package="PLCC-2 Lucky Light", Availability=Unavailable, MF="Lucky Light", MP=LL-R3528RGBC-008-B, Price=None, SnapEDA_Link=https://www.snapeda.com/parts/LL-R3528RGBC-008-B/Lucky%20Light/view-part/47649/?ref=snap
D1: "1N5819HW Series 40 V 1 A Surface Mount Schottky Barrier Rectifier - SOD-123", Package=None, Availability=Unavailable, MF="{'manufacturer': u'Diodes Inc.'}", MP=1N5819HW-7-F, Price=None
FL1 FL2: "Ferrite Beads Multi-Layer 33Ohm 25% 100MHz 6A 9mOhm DCR 1206 T/R", Package=None, Availability=Unavailable, MF="{'manufacturer': u'Murata Electronics'}", MP=BLM31PG330SN1L, Price=None
J_M1 J_M2 J_M3 J_M4: "Connector Header Through Hole 2 position 0.079 (2.00mm)", Package=None, Check_prices=https://www.snapeda.com/parts/B2B-PH-K-S%20(LF)(SN)/JST/view-part/?ref=eda, MF=JST, MP="B2B-PH-K-S (LF)(SN)", SnapEDA_Link=https://www.snapeda.com/parts/B2B-PH-K-S%20(LF)(SN)/JST/view-part/?ref=snap
P1 P2 P15: "Header, 10-Pin", LatestRevisionDate=17-Jul-2002, LatestRevisionNote="Re-released for DXP Platform.", Publisher="Altium Limited"
P3: "Header, 5-Pin", LatestRevisionDate=17-Jul-2002, LatestRevisionNote="Re-released for DXP Platform.", Publisher="Altium Limited"
P4 P9 P10 P13: "Header, 2-Pin", LatestRevisionDate=17-Jul-2002, LatestRevisionNote="Re-released for DXP Platform.", Publisher="Altium Limited"
P5: "Header, 2-Pin, Dual row", LatestRevisionDate=17-Jul-2002, LatestRevisionNote="Re-released for DXP Platform.", Publisher="Altium Limited"
P6 P7: "Header, 6-Pin", LatestRevisionDate=17-Jul-2002, LatestRevisionNote="Re-released for DXP Platform.", Publisher="Altium Limited"
P8 P11 P12: "Header, 4-Pin", LatestRevisionDate=17-Jul-2002, LatestRevisionNote="Re-released for DXP Platform.", Publisher="Altium Limited"
P14: "Header, 15-Pin", LatestRevisionDate=17-Jul-2002, LatestRevisionNote="Re-released for DXP Platform.", Publisher="Altium Limited"
P16: "Header, 3-Pin", LatestRevisionDate=17-Jul-2002, LatestRevisionNote="Re-released for DXP Platform.", Publisher="Altium Limited"
R1 R2 R3 R12 R13 R14 R15 R16 R17 R18 R19 R20 R21 R22 R23 R27 R28 R29 R30 R31 R32 R33 R34 R35 R36 R37 R38 R39 R40 R41 R42: library part 1-1879462-4, "RL73H 2B R43 1% 5K RL", Package=None, Availability=Unavailable, MF="{'manufacturer': u'TE Connectivity'}", MP=1-1879462-4, Price=None
R4 R5 R6 R7 R8 R9 R10 R11: "RL73H 2B R43 1% 5K RL", Package=None, Availability=Unavailable, MF="{'manufacturer': u'TE Connectivity'}", MP=1-1879462-4, Price=None
SW1 SW2: library part XKB5858-Z-TP-75, "250V 30V LATCHING Standing paste 100000 Times Without 160gf 100mA SMD Pushbutton Switches ROHS", ComponentLink1Description="Data sheet", ComponentLink1URL=https://www.lcsc.com/datasheet/lcsc_datasheet_2110111430_XKB-Connection-XKB5858-Z-TP-75_C692487.pdf
U2 U6 U9 U10: "SMD-4P,3.4x2.7mm Reflective Optical Interrupters ROHS"
U4: "Schmitt Trigger 6 21ns@6V 2uA 2V~6V SOP-14 Inverters ROHS"
U5 U7: "10.8-V, 2-A dual H-bridge motor driver with current regulation 16-HTSSOP -40 to 85", Package=None, Availability=Unavailable, MF="{'manufacturer': u'Texas Instruments'}", MP=DRV8833PWPR, Price=None
U8: "MIC5205 Series 3 V Fixed Output 150 mA SMT Low-Noise LDO Regulator - SOT-23-5", Package=None, Availability=Unavailable, MF="{'manufacturer': u'Microchip Technology'}", MP=MIC5205-2.5YM5-TR, Price=None
U11: "Triple Axis Accelerometer Gyro Breakout", Package=Package, Availability="Not in stock", Check_prices=https://www.snapeda.com/parts/GY-521/GODREAM+FORDREAM+CO.%252C+LIMITED/view-part/?ref=eda, MF="GODREAM FORDREAM CO., LIMITED", MP=GY-521, Price=None, SnapEDA_Link=https://www.snapeda.com/parts/GY-521/GODREAM+FORDREAM+CO.%252C+LIMITED/view-part/?ref=snap
V_MODE V_MOTOR: library part G-Switch, "Standing paste 1A DPDT 6V Black 10000 times SMD Slide Switches ROHS"
Y2: library part ABM8W-32.0000MHZ-6-B1U-T3, Package=None, Availability=Unavailable, MF="{'manufacturer': u'Abracon'}", MP=ABM8W-32.0000MHZ-6-B1U-T3, Price=None

## Free pads (board coordinates)
  round 5 hole 3: 22(0.25,4.675) 23(192.25,1.675) 24(191.5,91.925) 25(2.25,90.925)
  round 1.308 hole 0.9: 27(26.5,-3.325) 27(26.75,116.425) 27(38.75,-3.325) 27(40.5,-3.325) 27(40.75,116.425) 27(54.75,116.425) 27(68.75,116.425) 27(82.75,116.425) 27(96.75,116.425) 27(110.75,116.425) 27(124.75,116.425) 27(138.75,116.425) 27(152.75,116.425) 27(158.5,-3.325) 27(166.75,116.425) 27(170.75,-3.325) 27(172.5,-3.325) 28(28.25,-3.325) 28(28.5,116.425) 28(42.5,116.425) 28(56.5,116.425) 28(70.5,116.425) 28(84.5,116.425) 28(98.5,116.425) 28(112.5,116.425) 28(126.5,116.425) 28(140.5,116.425) 28(154.5,116.425) 28(160.25,-3.325) 29(30,-3.325) 29(30.25,116.425) 29(44.25,116.425) 29(58.25,116.425) 29(72.25,116.425) 29(86.25,116.425) 29(100.25,116.425) 29(114.25,116.425) 29(128.25,116.425) 29(142.25,116.425) 29(156.25,116.425) 29(162,-3.325) 30(31.75,-3.325) 30(32,116.425) 30(46,116.425) 30(60,116.425) 30(74,116.425) 30(88,116.425) 30(102,116.425) 30(116,116.425) 30(130,116.425) 30(144,116.425) 30(158,116.425) 30(163.75,-3.325) 31(33.75,116.425) 31(47.75,116.425) 31(61.75,116.425) 31(75.75,116.425) 31(89.75,116.425) 31(103.75,116.425) 31(117.75,116.425) 31(131.75,116.425) 31(145.75,116.425) 31(159.75,116.425) 32(21.25,-3.325) 32(33.5,-3.325) 32(35.5,116.425) 32(49.5,116.425) 32(63.5,116.425) 32(77.5,116.425) 32(91.5,116.425) 32(105.5,116.425) 32(119.5,116.425) 32(133.5,116.425) 32(147.5,116.425) 32(153.25,-3.325) 32(161.5,116.425) 32(165.5,-3.325) 33(23,-3.325) 33(35.25,-3.325) 33(37.25,116.425) 33(51.25,116.425) 33(65.25,116.425) 33(79.25,116.425) 33(93.25,116.425) 33(107.25,116.425) 33(121.25,116.425) 33(135.25,116.425) 33(149.25,116.425) 33(155,-3.325) 33(163.25,116.425) 33(167.25,-3.325) 34(24.75,-3.325) 34(37,-3.325) 34(39,116.425) 34(53,116.425) 34(67,116.425) 34(81,116.425) 34(95,116.425) 34(109,116.425) 34(123,116.425) 34(137,116.425) 34(151,116.425) 34(156.75,-3.325) 34(165,116.425) 34(169,-3.325)
  round 4 hole 3: 35(185.25,53.675) 36(185.25,36.175)

## Via types
v1: diameter 0.5, hole 0.35, Top Layer to Bottom Layer, 137 vias

## Nets (pads, with @x,y where several pads share a name; then routed paths per layer and width w, separated by ;. In a path a pad name is that pad's centre, name@x,y a point inside that pad or via, vN(x,y) a via of type N, cw(c..) or ccw(c..) an arc to the next point about the centre after c; other vN are vias at no path point)
3V3: C3.2 C4.2 C21.2 C22.2 D.1 P1.2 P1.3 P8.3 P11.1 P12.1 P13.1 P14.2 R3.2 R14.2 R15.2 R18.2 R19.2 R20.2 R28.2 R29.2 R31.2 R32.2 R33.2 R34.2 R35.2 R36.2 R37.2 R38.2 R39.2 R40.2 R41.2 R42.2 U1.2 U3.4 U3.16 U4.14 U8.5 U11.VCC | length 657.4
  Top Layer w0.254: R28.2@15.89,17.675 17.175,17.675 17.5,18 ; R29.2@15.89,23.175 17.325,23.175 17.5,23 17.5,18 ; R19.2@25.5,74.79 25.5,76.25 26.2,76.95 30.675,76.95 31.25,76.375 R20.2@31.25,74.79 32.81,74.79 ; U11.VCC@30.89,64.89 34.965,64.89 35.325,65.25 35.325,72.275 32.81,74.79 ; R14.2@31.89,18.175 33.425,18.175 ; R15.2@31.89,23.675 31.965,23.75 34.351,23.75 34.5,23.601 34.5,22.225 ; v1(32.75,19.75) 33.25,19.25 34.5,19.25 ; v1(34.725,74.85) 32.87,74.85 32.81,74.79 ; v1(38.475,76.95) 38.522,76.997 38.972,76.997 39.175,77.2 39.225,77.2 41.187,79.163 ; v1(38.6,70.575) 38.6,69.875 38.925,69.55 38.925,57.1 40.125,55.9 40.125,52.825 38.425,51.125 38.425,36.2 41.625,33 41.625,29.124 41.476,28.975 41.25,28.975 34.5,22.225 ; v1(42.425,77.375) 41.187,78.613 41.187,79.163 ; P1.3@72.15,87.995 70.455,87.995 69.275,89.175 69.275,89.55 70.26,90.535 ; U1.2@84,92.815 81.935,92.815 81.5,93.25 80,93.25 78.975,92.225 76.84,92.225 P14.2@76.65,92.035 74.485,92.035 74,91.55 73.165,91.55 P1.2@72.15,90.535 70.26,90.535 ; P13.1@114.29,100.5 113.5,99.71 113.5,92.5 113.649,92.351 116.351,92.351 117.25,93.25 ; D.1@118,73.3 117.75,73.05 117.75,71.75 118.25,71.25 120.825,71.25 ; C21.2@118.35,88.25 118.1,88.5 117.399,88.5 117.25,88.649 117.25,93.25 ; U8.5@118.7,94.05 118.45,94.05 117.9,93.5 117.5,93.5 117.25,93.25 ; C22.2@124.2,88.25 124.2,86.05 ; P8.3@133.17,12.175 133.17,9.399 133.319,9.25 139.75,9.25 141.5,11 141.5,14.75 140.25,16 140.25,25.25 142,27 149.676,27 ; U3.16@140.25,83.555 140.305,83.5 142.75,83.5 143.25,84 143.25,87.216 143.399,87.365 U3.4@145.75,87.365 148.236,87.365 148.5,87.101 148.5,85.25 150.75,83 150.75,76.25 ; C4.2@148.4,71.25 150.5,71.25 150.75,71.5 150.75,75.75 150.5,76 ; C3.2@148.4,76.25 150.25,76.25 150.5,76 ; R35.2@148.79,18.675 149.115,19 149.601,19 149.75,19.149 149.75,21.75 150,22 150,24 149.825,24.175 ; R36.2@148.79,24.175 149.825,24.175 ; v1(151.75,61.754) 151.75,63.5 ; v1(156.25,56.5) 156.25,51 154.25,49 P12.1@154.25,46.675 156.575,46.675 157.25,46 157.25,36 152.75,31.5 ; R38.2@163.29,18.675 165.675,18.675 167,20 167,23.5 166,24.5 163.615,24.5 R37.2@163.29,24.175 162.947,24.518 162.947,25.053 158.5,29.5 153.899,29.5 153.75,29.649 153.75,30.5 152.75,31.5 ; 17.5,18 17.75,17.75 18.25,17.75 18.5,18 26.5,18 27,17.5 28.5,16 32.75,16 33.425,16.675 33.425,18.175 ; 33.425,18.175 34.5,19.25 ; 34.5,19.25 34.5,22.225 ; 41.187,79.163 49.775,87.75 54.075,87.75 55.87,89.545 56.08,89.545 56.645,88.98 U4.14@56.645,86.06 58.785,86.06 60.2,87.475 60.2,90.2 61.21,91.21 R18.2@62.5,91.21 R3.2@67.25,91.21 67.465,91.425 69.15,91.425 70.04,90.535 70.26,90.535 ; 117.25,93.25 119.75,90.75 120.75,90.75 121.5,90 121.5,88.75 124.2,86.05 ; 120.825,71.25 130.075,62 150.25,62 151.75,63.5 ; 120.825,71.25 125.5,71.25 126.75,72.5 126.851,72.5 126.851,85.149 126.5,85.5 124.75,85.5 124.2,86.05 ; 149.676,27 149.676,28.426 152.75,31.5 ; 149.676,27 149.825,26.851 149.825,24.175 ; 150.5,76 150.75,76.25 ; 150.75,76.25 152.101,76.25 152.25,76.101 152.25,74.5 151.75,74 151.75,63.5
  Layer 2 w0.254: P14.2@76.65,92.035 76.669,92.035 77.354,91.35 81.675,91.35 86.075,95.75 102.5,95.75 107.25,100.5 107.25,102.5 107.5,102.75 114,102.75 114.29,102.46 P13.1@114.29,100.5 ; v1(151.75,61.754) 151.703,61.707 151.703,61.453 151.5,61.25 151.5,60.399 151.649,60.25 152.5,60.25 v1(156.25,56.5)
  Bottom Layer w0.254: v1(32.75,19.75) 33.125,19.75 33.375,19.5 ; R31.2@34.71,23.75 33.524,23.75 33.375,23.601 33.375,19.5 ; v1(34.725,74.85) 34.772,74.897 35.022,74.897 35.025,74.9 36.425,74.9 v1(38.475,76.95) ; v1(38.6,70.575) 42.6,74.575 42.6,77.2 v1(42.425,77.375) ; R34.2@49.71,23.175 49.71,24.96 50.452,25.702 53.298,25.702 54.5,24.5 54.5,16.5 54,16 52.399,16 51.5,16.899 51.5,17.35 51.175,17.675 R33.2@49.71,17.675 48.075,17.675 47.5,18.25 41.25,18.25 37.25,14.25 35.5,14.25 34.5,15.25 34.5,17.04 R32.2@34.71,17.25 34.71,17.599 34.367,17.942 33.608,17.942 33.375,18.175 33.375,19.5 ; P12.1@154.25,46.675 P11.1@193.75,46.675 191.25,44.175 191.25,30 189.25,28 189.25,26.75 188.29,25.79 183.21,25.79 ; R42.2@168.21,18.675 R41.2@168.21,23.675 168.25,23.715 168.25,25.5 168.75,26 183,26 183.21,25.79 ; R40.2@183.21,18.175 R39.2@183.21,23.675 183.21,25.79
AIN1: P6.3 P14.3 U1.7 U5.16 | length 91.1
  Top Layer w0.254: v1(54.525,76.8) 54.65,76.675 57.75,76.675 59.125,75.3 59.125,70.3 64.2,65.225 P6.3@64.2,63.9 ; v1(65.8,86.35) 65.8,89.225 66.125,89.55 66.125,89.633 66.25,89.758 v1(66.25,89.825) ; P14.3@76.65,89.495 79.68,86.465 U1.7@84,86.465 ; U5.16@79.15,52.375 79.225,52.3 80.433,52.3 80.733,52.6 v1(80.8,52.6)
  Layer 2 w0.254: v1(54.525,76.8) 63.775,76.8 64.625,77.65 65.7,77.65 69.05,81 69.05,83.4 66.575,85.875 65.833,85.875 65.684,86.024 65.684,86.234 v1(65.8,86.35) ; P6.3@64.2,63.9 64.2,63.563 64.571,63.192 64.571,63.179 64.927,62.823 66.677,62.823 70,59.5 70,55.75 72.35,53.4 80.6,53.4 80.9,53.1 80.9,52.7 v1(80.8,52.6) ; v1(66.25,89.825) 69.8,89.825 70.375,89.25 73.975,89.25 74.22,89.495 P14.3@76.65,89.495
AIN1_2: P7.3 P15.2 U1.21 U7.16 | length 87.1
  Top Layer w0.254: P15.2@84.79,66.175 84.675,66.29 84.675,67.726 84.824,67.875 86,67.875 87.5,69.375 89.9,69.375 93.385,72.86 U1.21@93.385,76.325 ; v1(114,46) 114,47.2 114.6,47.8 115.575,47.8 U7.16@115.6,47.825
  Layer 2 w0.254: P15.2@84.79,66.175 84.625,66.01 84.625,64.4 85.725,63.3 85.725,60.075 87.65,58.15 106.35,58.15 107.6,59.4 107.6,62.3 108.075,62.775 119.026,62.775 119.175,62.626 119.175,61.125 P7.3@119.2,61.1 119.2,58.2 115,54 112,54 111,53 111,48 113,46 v1(114,46)
AIN2: P1.10 P6.4 U1.6 U5.15 | length 97.7
  Top Layer w0.254: v1(68.025,73.125) 68.125,73.125 71.019,70.231 72.134,70.231 P1.10@72.15,70.215 ; U5.15@79.15,51.725 81.558,51.725 81.733,51.9 v1(81.8,51.9) ; v1(80.475,87.9) 80.542,87.9 80.707,87.735 U1.6@84,87.735
  Layer 2 w0.254: v1(68.025,73.125) 66.74,71.84 P6.4@66.74,63.9 70.5,60.14 70.5,56.5 73,54 81.1,54 82.1,53 82.1,52.2 v1(81.8,51.9) ; P1.10@72.15,70.215 72.321,70.044 73.132,70.044 73.281,69.895 73.281,57.169 74.85,55.6 78.3,55.6 80.725,58.025 80.725,87.583 80.475,87.833 v1(80.475,87.9)
AIN2_2: P7.4 P15.1 U1.20 U7.15 | length 90.1
  Top Layer w0.254: P15.1@82.25,66.175 82.25,67.35 84.8,69.9 89.425,69.9 92.115,72.59 U1.20@92.115,76.325 ; v1(114.2,48.4) 114.231,48.4 114.306,48.475 U7.15@115.6,48.475
  Layer 2 w0.254: P15.1@82.25,66.175 82.25,61.725 87.15,56.825 112.385,56.825 P7.4@116.66,61.1 116.66,56.96 115.1,55.4 112.2,55.4 109.9,53.1 109.9,47.6 112.119,45.381 113.338,45.381 113.35,45.369 114.569,45.369 114.8,45.6 114.8,46.651 114.651,46.8 113.7,46.8 113,47.5 113,48.2 113.2,48.4 v1(114.2,48.4)
BIN1: P1.9 P6.5 U1.5 U5.9 | length 102.4
  Top Layer w0.254: U5.9@79.15,47.825 79.248,47.727 80.173,47.727 80.5,47.4 80.5,47.067 80.1,46.667 v1(80.1,46.6) ; v1(80.675,89.4) 80.722,89.447 81.134,89.447 81.179,89.492 81.433,89.492 81.92,89.005 U1.5@84,89.005
  Layer 2 w0.254: v1(80.1,46.6) 80.1,48.961 83.081,51.942 83.081,53.058 81.539,54.6 73.65,54.6 71,57.25 71,62.18 P6.5@69.28,63.9 69.28,64.237 69.878,64.835 69.878,72.329 70.199,72.65 72.045,72.65 P1.9@72.15,72.755 72.211,72.694 73.281,72.694 73.8,72.175 73.8,57.375 74.925,56.25 78.225,56.25 79.1,57.125 79.1,57.325 79.85,58.075 79.85,79.275 79.9,79.325 79.9,85.1 79.7,85.3 79.7,89.25 79.85,89.4 v1(80.675,89.4)
BIN1_2: P7.5 P14.15 U1.19 U7.9 | length 79.4
  Top Layer w0.254: U1.19@90.845,76.325 90.845,72.595 89.025,70.775 83.35,70.775 79.875,67.3 79.875,61.275 77.781,59.181 76.816,59.181 P14.15@76.65,59.015 77.64,58.025 85.525,58.025 85.776,57.774 97.926,57.774 98.075,57.923 98.075,58.475 98.775,59.175 98.775,60.525 100.725,62.475 113.971,62.475 114.12,62.326 P7.5@114.12,61.1 114.12,52.68 114.425,52.375 U7.9@115.6,52.375
BIN2: P1.8 P6.6 U1.4 U5.10 | length 122
  Top Layer w0.254: v1(61.925,72.425) 61.925,72.358 62.2,72.083 62.2,69.55 64.625,67.125 70.5,67.125 71.82,65.805 P6.6@71.82,63.9 ; U5.10@79.15,48.475 80.225,48.475 81.2,47.5 v1(81.2,46.3) ; v1(81.45,90.4) 81.517,90.4 81.642,90.275 U1.4@84,90.275
  Layer 2 w0.254: v1(61.925,72.425) 64.525,72.425 67.395,75.295 P1.8@72.15,75.295 74.045,75.295 74.55,74.79 74.55,57.875 75.75,56.675 77.9,56.675 78.125,56.9 78.125,57.15 79.35,58.375 79.35,73.701 79.175,73.876 79.175,90.225 79.35,90.4 v1(81.45,90.4) ; P6.6@71.82,63.9 71.82,57.18 73.781,55.219 81.781,55.219 83.8,53.2 83.8,49.072 81.247,46.519 81.247,46.347 v1(81.2,46.3)
BIN2_2: P7.6 P14.14 U1.18 U7.10 | length 79.6
  Top Layer w0.254: U1.18@89.575,76.325 89.575,72.3 89.05,71.775 83.45,71.775 78.9,67.225 78.9,63.1 78.55,62.75 77.845,62.75 P14.14@76.65,61.555 75.305,61.555 74.55,60.8 74.55,58.41 75.81,57.15 98.05,57.15 102,61.1 P7.6@111.58,61.1 112.5,60.18 112.5,53.5 114.275,51.725 U7.10@115.6,51.725
D1_N: D7.2 J9.A7 J9.B7 P14.9 U1.13 | length 115.5
  Top Layer w0.381: v1(30.667,103.533) 30.699,103.533 30.86,103.694 32.105,103.694 32.541,103.258 J9.B7@33.755,103.258 ; J9.A7@34.139,102.226 36.693,102.226 v1(36.968,102.5) 36.991,102.523 37.315,102.523 37.572,102.779 37.572,106.071 37.358,106.285 37.358,109.477 37.134,109.7 36.225,109.7 36.225,109.702 36.002,109.925 35.46,109.925 35.135,110.251 35.135,110.291 35.125,110.3 D7.2@35.085,110.3 ; P14.9@76.65,74.255 76.65,73.952 77.028,73.575 77.028,73.526 77.251,73.303 77.566,73.303 78.992,74.728 78.992,75.755 81.764,78.527 83.217,78.527 83.275,78.585 83.741,78.585 U1.13@84,78.845
  Layer 2 w0.381: v1(30.667,103.533) 30.699,103.533 30.86,103.694 31.506,103.694 33.033,102.167 35.863,102.167 35.973,102.057 36.661,102.057 36.945,102.341 36.945,102.477 v1(36.968,102.5)
  Bottom Layer w0.381: v1(36.968,102.5) 36.968,102.532 37.476,103.04 37.476,103.16 37.499,103.183 37.691,102.992 38.111,102.992 38.828,103.709 43.579,103.709 44.124,104.255 65.42,104.255 69.354,100.32 69.354,70.851 68.846,70.343 68.846,68.154 69.3,67.7 73.842,67.7 74.065,67.923 74.065,72.707 74.66,73.303 75.697,73.303 P14.9@76.65,74.255
D1_P: D6.2 J9.A6 J9.B6 P14.10 U1.14 | length 114.8
  Top Layer w0.381: v1(31.2,103) 31.232,103 31.419,103.186 31.895,103.186 32.331,102.75 J9.A6@33.755,102.75 ; J9.B6@34.139,101.718 37.619,101.718 37.92,102.019 v1(37.953,102.019) 37.941,102.031 37.941,102.43 38.08,102.569 38.08,106.281 37.866,106.496 37.866,109.477 38.089,109.7 38.998,109.7 39.175,109.877 39.175,110.192 38.952,110.416 38.73,110.416 D6.2@38.72,110.425 ; P14.10@76.65,71.715 76.65,72.018 77.028,72.395 77.028,72.444 77.251,72.668 77.829,72.668 79.627,74.465 79.627,75.492 82.027,77.892 83.217,77.892 83.275,77.834 83.741,77.834 U1.14@84,77.575
  Layer 2 w0.381: v1(31.2,103) 31.232,103 31.794,102.438 31.864,102.438 32.77,101.532 35.6,101.532 35.71,101.422 36.924,101.422 37.498,101.996 37.93,101.996 v1(37.953,102.019)
  Bottom Layer w0.381: v1(37.953,102.019) 37.953,102.051 39.057,103.156 43.316,103.156 43.357,103.115 43.766,103.115 43.952,103.301 44.069,103.301 44.387,103.62 65.157,103.62 68.719,100.057 68.719,71.114 68.211,70.606 68.211,67.89 69.037,67.065 74.105,67.065 74.7,67.66 74.7,72.444 74.923,72.668 75.697,72.668 P14.10@76.65,71.715
D_N: D3.2 J10.A7 J10.B7 P4.2 U3.6 | length 40
  Top Layer w0.254: P4.2@152,90.54 151.776,90.316 151.776,89.673 151.627,89.524 148.919,89.524 146.427,89.524 146.278,89.673 146.278,89.722 146.095,89.905 U3.6@145.75,89.905 145.405,89.905 145.222,89.722 145.222,89.673 145.073,89.524 143.345,89.524 143.196,89.673 143.196,94.343 143.345,94.492 150.242,94.492 155.25,99.5 ; D3.2@156,98.16 155.969,98.191 155.969,98.781 155.25,99.5 ; J10.A7@160.145,102.75 160.149,102.746 161.424,102.746 161.5,102.67 161.5,101.75 J10.B7@160.145,101.75 160.137,101.742 158.5,101.742 158.389,101.631 157.849,101.631 157.21,100.992 156.742,100.992 155.25,99.5
D_P: D4.2 J10.A6 J10.B6 P4.1 U3.5 | length 40.1
  Top Layer w0.254: D4.2@151,97.93 151,97.89 151.073,97.817 151.116,97.817 151.962,96.971 151.962,96.931 ; P4.1@152,88 151.411,88.589 151.411,88.867 151.262,89.016 149.129,89.016 146.427,89.016 146.278,88.867 146.278,88.818 146.095,88.635 U3.5@145.75,88.635 145.405,88.635 145.222,88.818 145.222,88.867 145.073,89.016 143.135,89.016 142.688,89.462 142.688,94.554 143.135,95 150.032,95 151.962,96.931 ; J10.A6@160.145,102.25 158.5,102.25 ; J10.B6@160.145,103.25 158.78,103.25 158.631,103.101 158.631,102.739 158.5,102.608 158.5,102.25 ; 151.962,96.931 154.891,99.859 156.532,101.5 157,101.5 157.639,102.139 158.179,102.139 158.29,102.25 158.5,102.25
DCD: P3.2 U3.12 | length 11.3
  Top Layer w0.254: P3.2@131.5,82.46 132.71,82.46 138.885,88.635 U3.12@140.25,88.635
DTR: Q2.2 R1.1 U3.13 | length 43.1
  Top Layer w0.254: v1(132.25,72.25) 131.75,72.75 131.75,76 134.75,79 134.75,83.5 138.615,87.365 U3.13@140.25,87.365 ; v1(133.297,70.869) 133.344,70.822 133.344,70.481 133.358,70.467 133.358,70.108 ; R1.1@134.785,68 133.5,68 132.75,68.75 132.75,69.959 132.899,70.108 133.358,70.108 ; Q2.2@142.45,72.15 144.351,72.15 144.5,72.001 144.5,69.75 143.5,68.75 141.5,68.75 140.142,70.108 133.358,70.108
  Layer 2 w0.254: v1(132.25,72.25) 132.928,71.572 132.928,71.305 133.297,70.936 v1(133.297,70.869)
EN: C1.2 P1.7 Q1.3 R3.1 R18.1 SW1.2 U1.3 | length 240.3
  Top Layer w0.254: R18.1@62.5,94.215 62.5,96.425 62.9,96.825 67.075,96.825 ; R3.1@67.25,94.215 67.25,96.65 67.075,96.825 ; v1(67.371,97.75) 67.369,97.748 67.369,97.119 67.075,96.825 ; v1(78.513,88.7) 78.56,88.747 78.56,89.21 78.575,89.225 78.575,90.5 79.62,91.545 81.705,91.545 ; v1(81,92.25) 81.705,91.545 ; U1.3@84,91.545 81.705,91.545 ; v1(141.75,63.75) 141.75,64 142,64.25 144.5,64.25 ; Q1.3@143.45,66 144.351,66 144.5,65.851 144.5,64.25 ; C1.2@148.4,66.25 150,66.25 150.75,65.5 ; v1(150,68.25) 150.75,67.5 150.75,65.5 ; v1(161.75,76.25) 175.843,76.25 178.5,78.907 178.5,82.601 178.351,82.75 SW1.2@174.775,82.75 ; 144.5,64.25 145.25,63.5 145.25,63.149 145.399,63 150,63 150.75,63.75 150.75,65.5
  Layer 2 w0.254: v1(67.371,97.75) 67.371,96.562 67.549,96.384 67.759,96.384 68.15,96.775 79.275,96.775 81,95.05 v1(81,92.25) ; P1.7@72.15,77.835 72.235,77.92 73.405,77.92 74.95,76.375 74.95,58.275 75.75,57.475 77.125,57.475 78.513,58.863 v1(78.513,88.7) ; v1(141.75,63.75) v1@141.75,63.817 ; v1(150,68.25) 149.933,68.25 149.707,68.477 149.531,68.477 149.359,68.649 149.359,68.859 157.5,77 161,77 v1(161.75,76.25)
  Bottom Layer w0.254: v1(81,92.25) 81.034,92.284 81.631,92.284 81.758,92.411 81.911,92.411 85.149,95.649 98,95.649 98.149,95.5 104.75,95.5 106.5,97.25 110,97.25 110.25,97 112,97 114.75,94.25 114.75,83 134,63.75 v1(141.75,63.75)
Encod1: R28.1 R29.1 U2.4 U4.1 | length 103
  Top Layer w0.254: R28.1@12.885,17.675 10.825,17.675 10.5,18 10.5,23 10.675,23.175 R29.1@12.885,23.175 12.885,24.385 14.25,25.75 23.25,25.75 ; U2.4@24.5,21.9 24.5,24.5 23.25,25.75 ; v1(38.8,54.3) 24.5,40 24.5,27 23.25,25.75 ; v1(45.716,55.791) 46.75,56.825 46.75,83.5 49.31,86.06 U4.1@51.355,86.06
  Layer 2 w0.254: v1(38.8,54.3) 40.575,56.075 42.971,56.075 43.254,55.791 v1(45.716,55.791)
Encod2: R33.1 R34.1 U4.3 U6.4 | length 87.3
  Top Layer w0.254: v1(48.75,83.5) 48.76,83.51 51.345,83.51 U4.3@51.355,83.52
  Bottom Layer w0.254: U6.4@45.5,19.275 48.025,19.275 48.75,20 51.75,20 ; v1(48.75,83.5) 48,82.75 48,21.75 48.5,21.25 50,21.25 51,22.25 51,24.851 51.149,25 51.25,25 51.5,25.25 52,25.25 52.715,24.535 R34.1@52.715,23.175 52.715,22.835 51.75,21.87 51.75,20 ; R33.1@52.715,17.675 52.715,19.035 51.75,20